# Altium PCB PD1_5.PcbDoc
Units mil, origin at the board's own origin, x right, y up, seen from the top; angles counter-clockwise.
Board outline 4000 x 4000 mil, 2 copper layers (Top Layer, Bottom Layer); 48 components, 29 nets, 246 pads, 55 vias.
Unrouted connection lines stored in the file: 4.
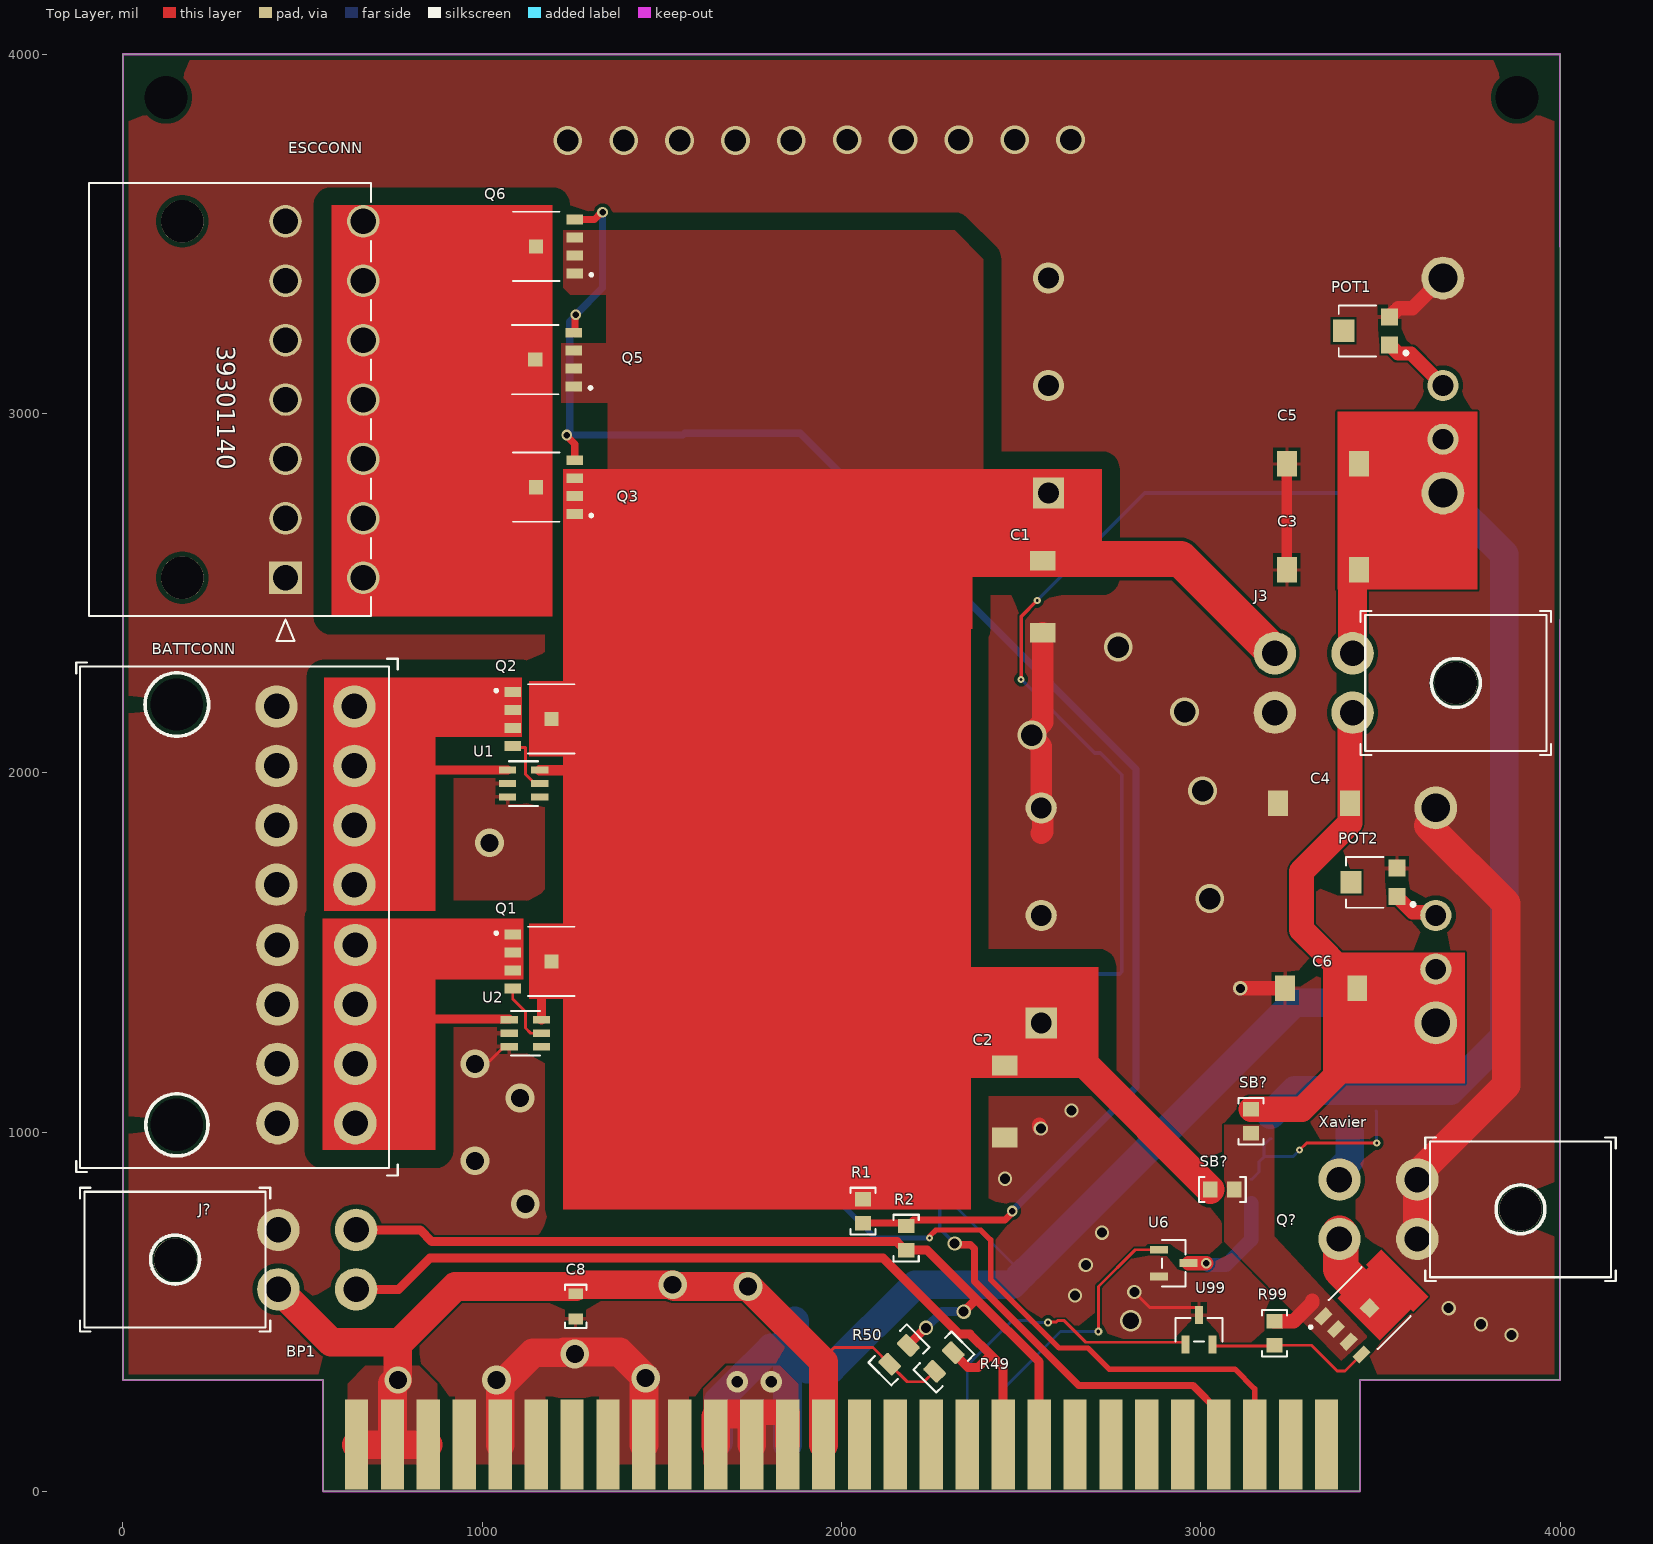
[diagram p0: Top Layer view]
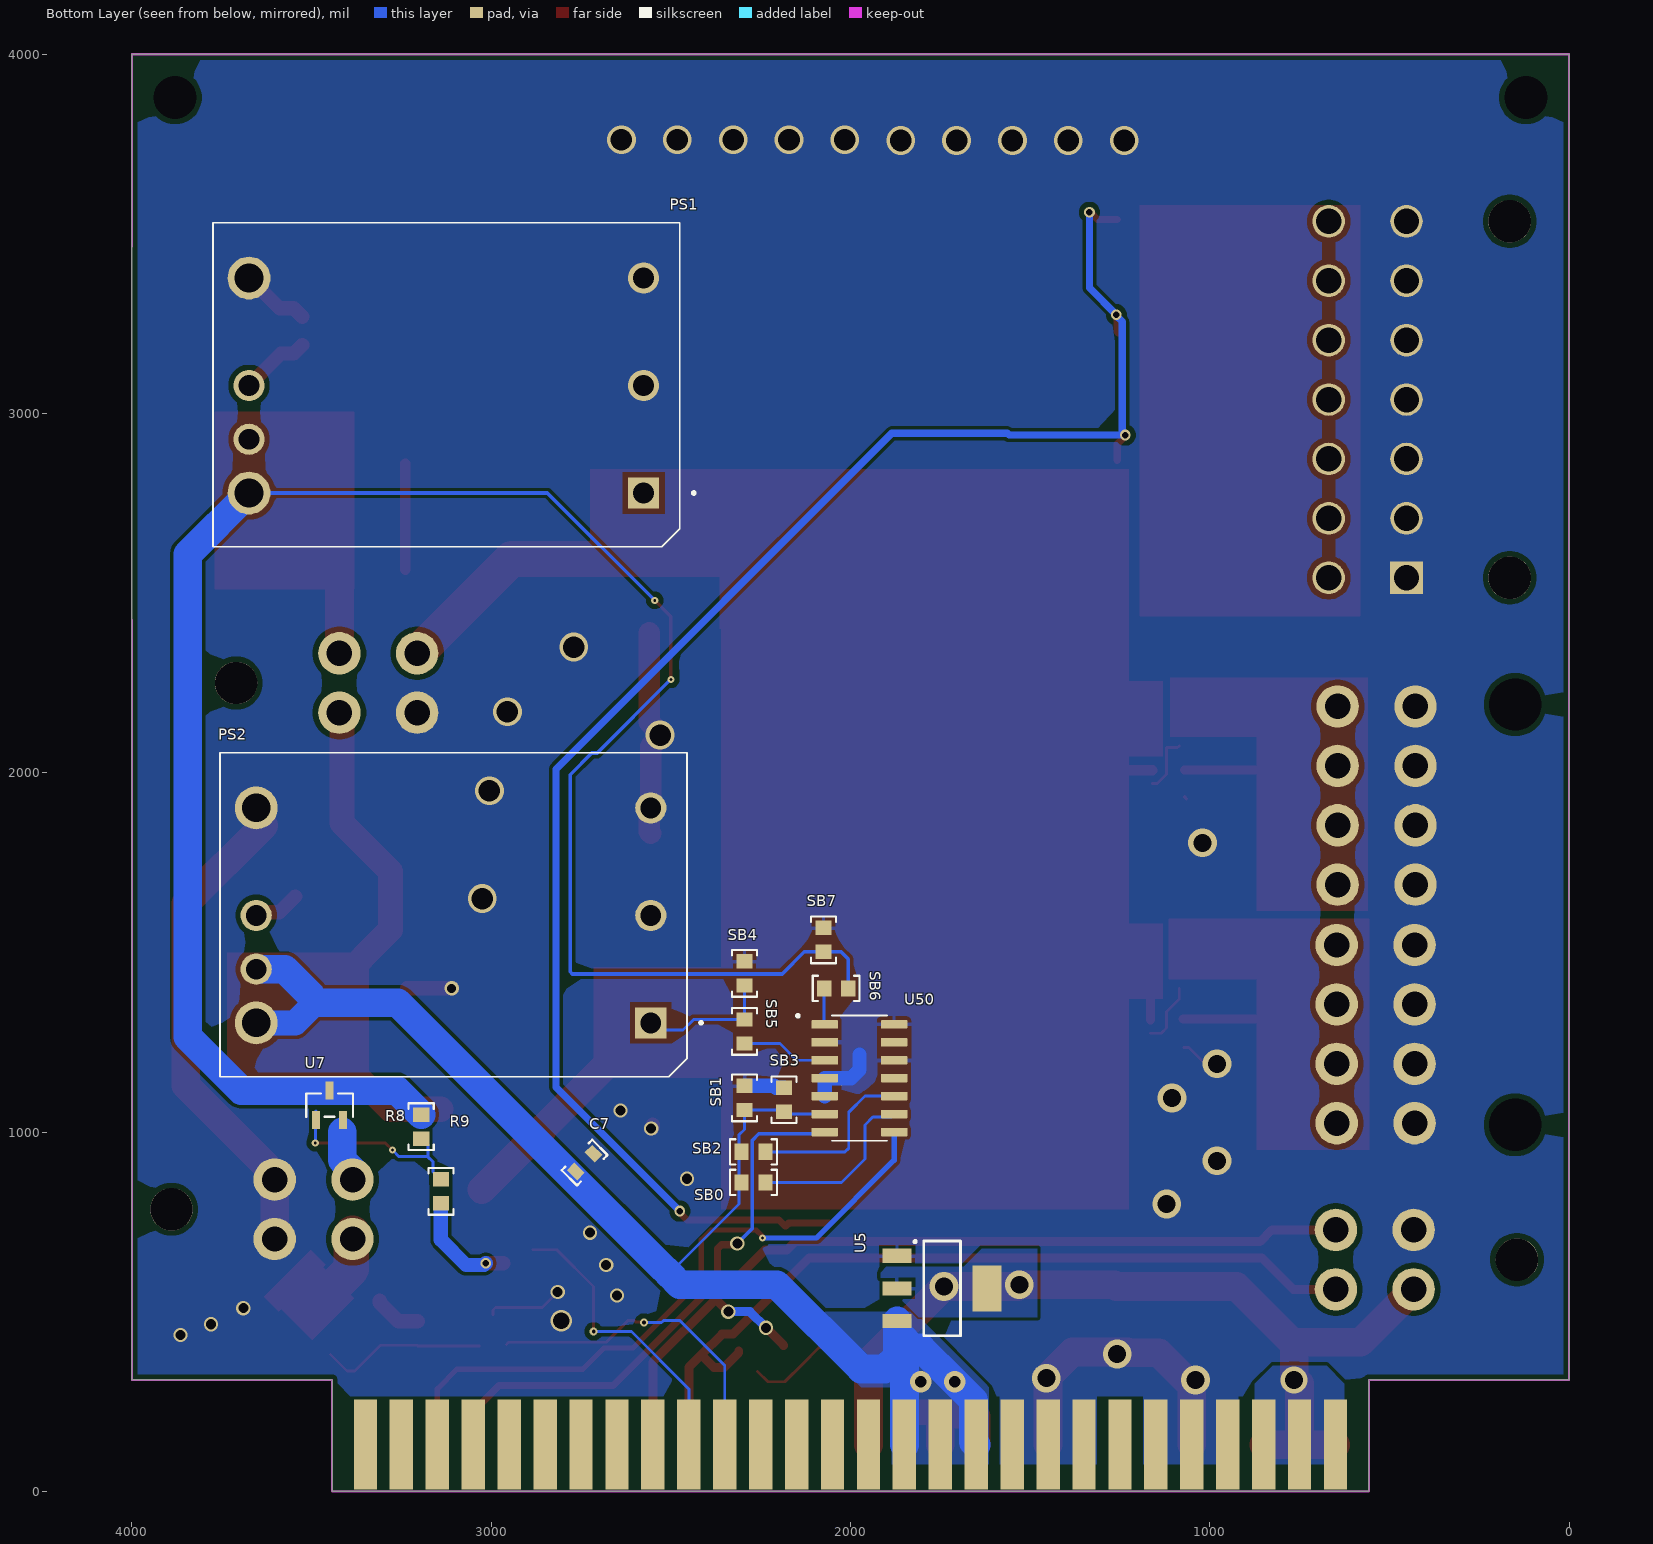
[diagram p1: Bottom Layer view, seen from below]
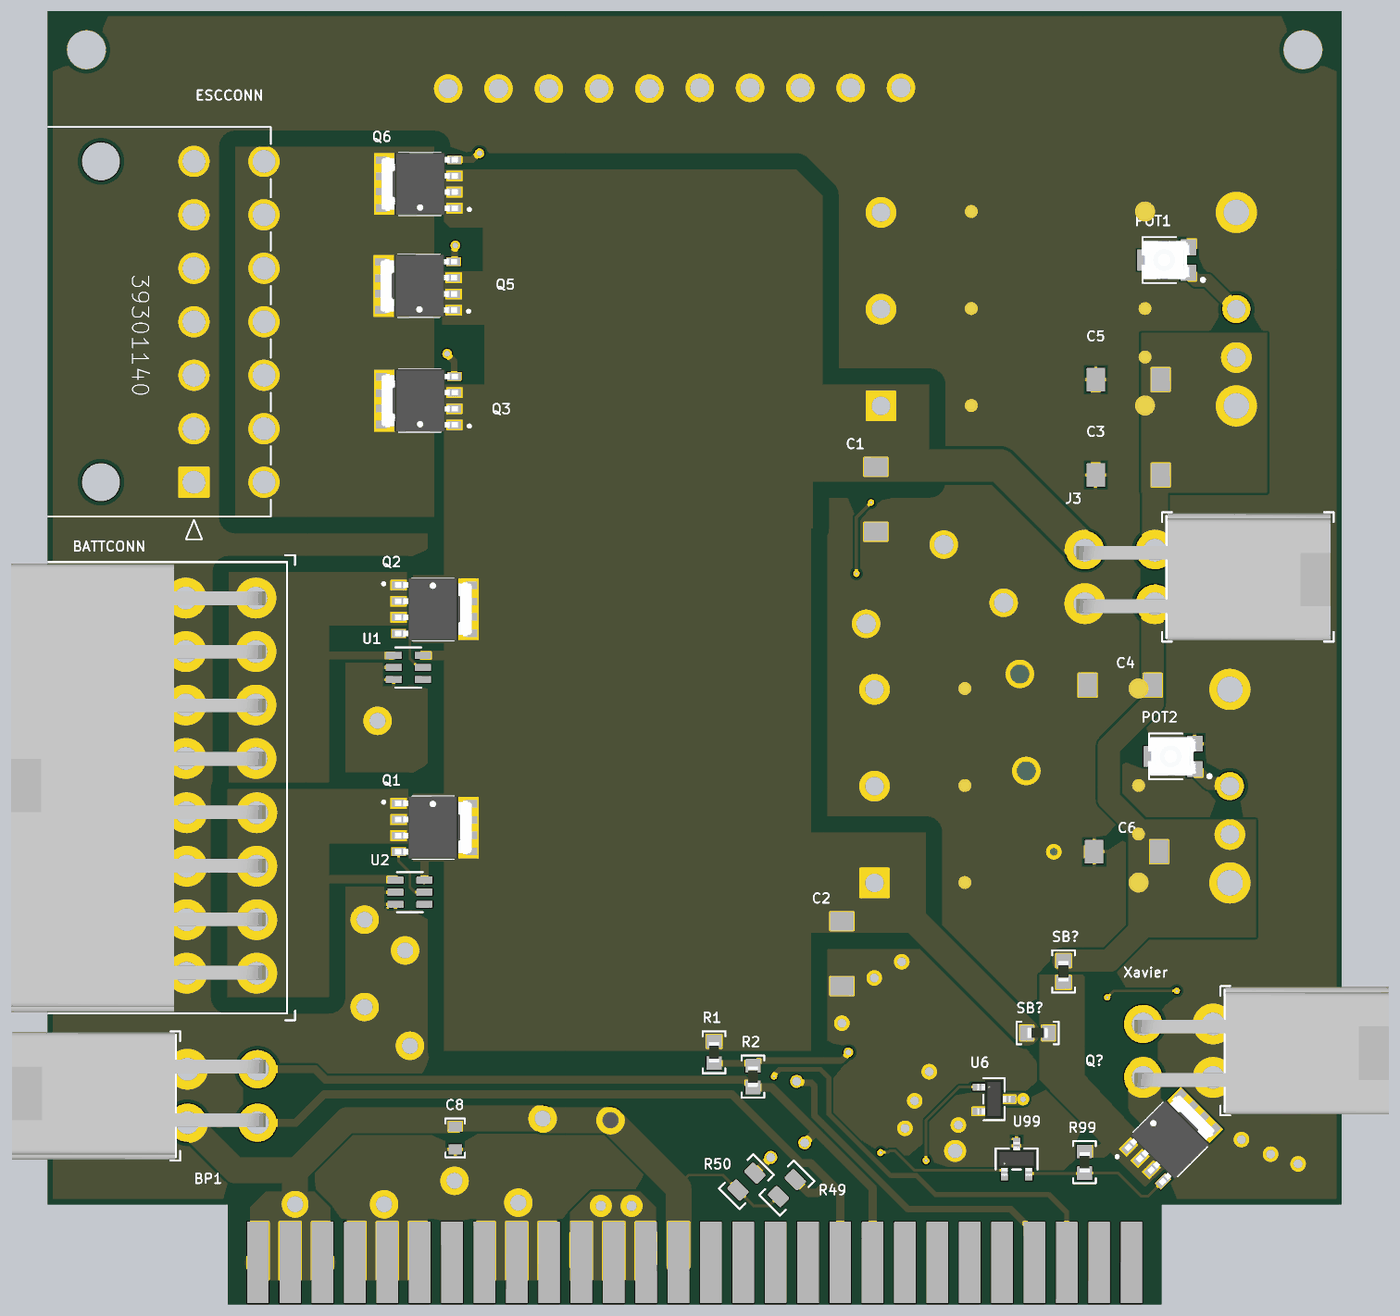
[diagram p2: 3D render of the assembled board from above, using the file's embedded part models]
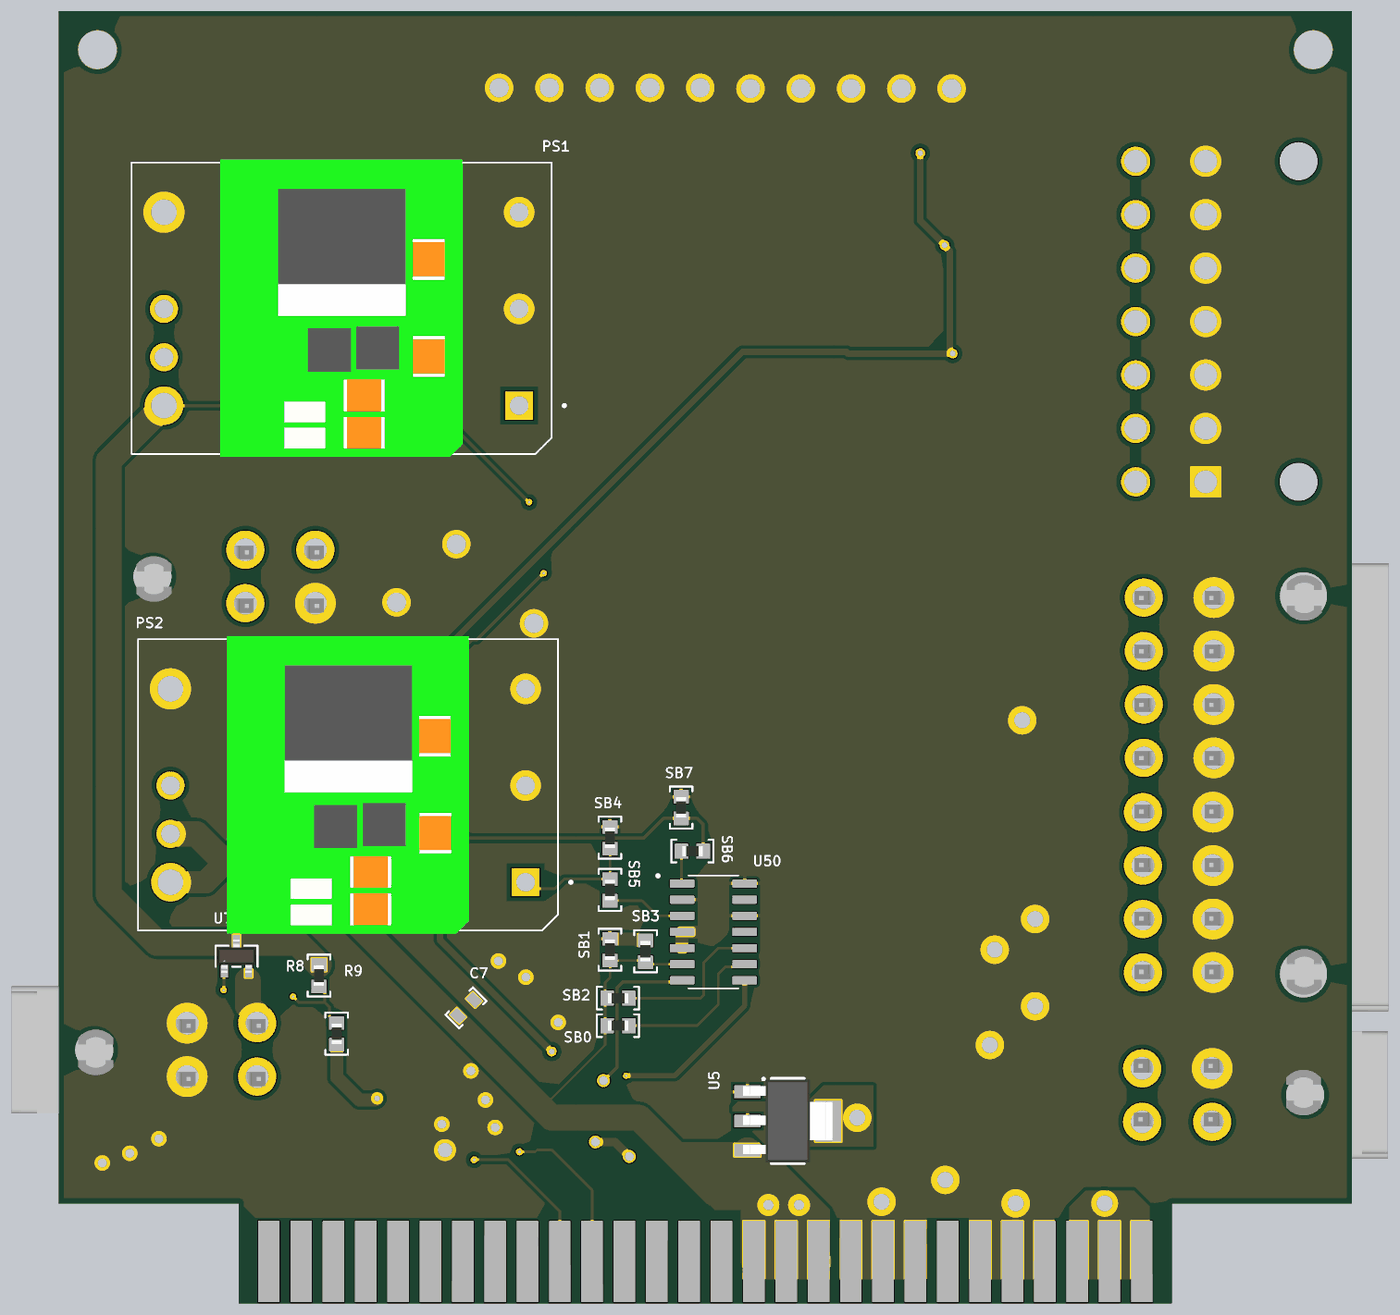
[diagram p3: 3D render of the assembled board from below, using the file's embedded part models]

## Layer stack, top to bottom
Top Solder: solder mask 0.4, Solder Resist, Dk 3.5
Top Layer: signal copper 1.4
Dielectric 1: dielectric 12.6, FR-4, Dk 4.8
Bottom Layer: signal copper 1.4
Bottom Solder: solder mask 0.4, Solder Resist, Dk 3.5

## Board outline
557,0 557,310 0,310 0,4000 4000,4000 4000,3465 4000,2425 4000,310 3443,310 3443,0

## Design rules (kind name [scope] priority, off if disabled: settings)
AcuteAngle [All] p1: minimum=8.75000000000000E+0001 checktracksonly=FALSE
BoardOutlineClearance [All] p1: gap=16 ignorepadtopadclearanceinfootprint=FALSE
Clearance Clearance_5 [InNamedPolygon('GND_L02_P046')] p1: gap=10 ignorepadtopadclearanceinfootprint=FALSE except(0: Arc-Hole Track-Hole SMDPad-Hole THPad-Hole Via-Hole Fill-Hole Poly-Hole Region-Hole Text-Hole; 15: THPad-Poly Via-Poly)
Clearance Clearance_4 [InNamedPolygon('GND_L01_P045') vs InNet('Motor_Power')] p2: gap=10 ignorepadtopadclearanceinfootprint=FALSE except(0: Arc-Hole Track-Hole SMDPad-Hole THPad-Hole Via-Hole Fill-Hole Poly-Hole Region-Hole Text-Hole; 50: Fill-Fill Fill-Poly Poly-Poly)
Clearance Clearance_3 [InNamedPolygon('GND_L01_P045') vs InNet('STBD_BATT')] p3: gap=10 ignorepadtopadclearanceinfootprint=FALSE except(0: Arc-Hole Track-Hole SMDPad-Hole THPad-Hole Via-Hole Fill-Hole Poly-Hole Region-Hole Text-Hole; 50: Fill-Fill Fill-Poly Poly-Poly)
Clearance Clearance_2 [InNamedPolygon('GND_L01_P045') vs InNet('PORT_BATT')] p4: gap=10 ignorepadtopadclearanceinfootprint=FALSE except(0: Arc-Hole Track-Hole SMDPad-Hole THPad-Hole Via-Hole Fill-Hole Poly-Hole Region-Hole Text-Hole; 50: Fill-Fill Fill-Poly Poly-Poly)
Clearance Clearance_1 [InNamedPolygon('GND_L01_P045') vs InNet('V+')] p5: gap=10 ignorepadtopadclearanceinfootprint=FALSE except(0: Arc-Hole Track-Hole SMDPad-Hole THPad-Hole Via-Hole Fill-Hole Poly-Hole Region-Hole Text-Hole; 50: Fill-Poly Poly-Poly)
Clearance [InNamedPolygon('GND_L01_P044')] p6: gap=10 ignorepadtopadclearanceinfootprint=FALSE except(0: Arc-Hole Track-Hole SMDPad-Hole THPad-Hole Via-Hole Fill-Hole Poly-Hole Region-Hole Text-Hole; 50: Fill-Fill Fill-Poly Poly-Poly)
Clearance "Clearance JLCPCB" [All] p7: gap=6 ignorepadtopadclearanceinfootprint=FALSE except(3.5: Arc-Arc Arc-Track Track-Track; 5: Arc-SMDPad Track-SMDPad SMDPad-SMDPad; 10: Arc-Via Arc-Hole Track-Via Track-Hole Via-Via Via-Fill Via-Poly Via-Region Fill-Hole Poly-Hole Region-Hole; 12.99: Arc-THPad Track-THPad; 13: THPad-Fill THPad-Poly THPad-Region; 20: THPad-THPad)
Clearance "Clearance Vplus" [InNet('GND') vs InNet('V+')] p8: gap=6 ignorepadtopadclearanceinfootprint=FALSE except(3.5: Arc-Arc Arc-Track Track-Track; 5: Arc-SMDPad Track-SMDPad SMDPad-SMDPad; 10: Arc-Via Arc-Hole Track-Via Track-Hole Via-Via Via-Fill Via-Poly Via-Region Fill-Hole Poly-Hole Region-Hole; 12.99: Arc-THPad Track-THPad; 13: THPad-Fill THPad-Poly THPad-Region; 20: THPad-THPad; 50: Poly-Poly)
ComponentOrientations [All] p1: allowedrotations=32
DiffPairsRouting "USB 2.0" [InDifferentialPairClass('USB 2.0')] p1: maxlimit=4 minlimit=4 mostfreqgap=4 toplayer_minwidth=9 toplayer_maxwidth=9 toplayer_prefwidth=9 bottomlayer_minwidth=9 bottomlayer_maxwidth=9 bottomlayer_prefwidth=9 impedanceprofiledriven=TRUE impedanceprofileid={B279FAB8-9179-4BDF-8125-EF1A8961339F} maxuncoupledlength=500
DiffPairsRouting [All] p2: maxlimit=10 minlimit=10 mostfreqgap=10 toplayer_minwidth=15 toplayer_maxwidth=15 toplayer_prefwidth=15 bottomlayer_minwidth=15 bottomlayer_maxwidth=15 bottomlayer_prefwidth=15 maxuncoupledlength=500
FanoutControl Fanout_Default [All] p5: bgadir=Out bgaviamode=Centered fanoutstyle=Auto fanoutdirection=OutOnly viagrid=1 // Fanout_Default (Default Rule)
HoleSize "HoleSize JLCPCB" [All] p1: absolutevalues=TRUE maxlimit=245 minlimit=8 maxpercent=80.000 minpercent=20.000
HoleToHoleClearance "HoleToHoleClearance JLCPCB" [All] p1: gap=20 allowstackedmicrovias=TRUE
MinimumAnnularRing "MinimumAnnularRing JLCPCB" [All] p1: minimumring=6
MinimumSolderMaskSliver [All] p1 off: minsoldermaskwidth=10
PasteMaskExpansion [All] p1: expansion=1
PlaneClearance [InNet('GND')] p1: clearance=20
PolygonConnect EdgeConnect [(IsNamedPolygon('PolygonDirect'))] p1: connectstyle=Direct reliefconductorwidth=10 reliefentries=4 polygonreliefangle="90 Angle" airgapwidth=10
PolygonConnect [All] p2: connectstyle=Relief reliefconductorwidth=10 reliefentries=4 polygonreliefangle="90 Angle" airgapwidth=10
RoutingVias "RoutingVias JLCPCB" [All] p1: holewidth=10 width=22 viastyle="Through Hole" minholewidth=8 minwidth=20 maxholewidth=28 maxwidth=40
SMDEntry [All] p1: side=TRUE corner=TRUE anyangle=FALSE
SMDToCorner [All] p1: distance=0
SMDToPlane [All] p1: distance=0
SilkToSilkClearance [All] p1: silktosilkclearance=1
SilkToSolderMaskClearance "SilkToSolderMaskClearance JLCPCB" [IsPad] p1: minsilkscreentomaskgap=6 clearancetoexposedcopper=TRUE
SolderMaskExpansion [All] p1: expansion=4 istentingtop=FALSE
UnRoutedNet [All] p1: checkbadconnections=TRUE
Width "Width JLCPCB 1oz" [All] p1: maxlimit=100 minlimit=5 preferedwidth=8 minimp=50.000000 maximp=50.000000 favimp=50.000000
20 further rules are at their usual default settings.

## Classes and differential pairs
component class "PD1_5 _S2": ? BATTCONN BATTERYCONNECTOR? BP1 ESC_CONN? ESCCONN J3 J? R49 R50 SB0 SB1 SB2 SB3 SB4 SB5 SB6 SB7 U50 Xavier
component class PD1_5: ? BATTERYCONNECTOR? C1 C2 C3 C4 C5 C6 C7 C8 ESC_CONN? POT1 POT2 PS1 PS2 Q1 Q2 Q3 Q5 Q6 Q? R1 R2 R8 R9 R99 SB? U1 U2 U5 U6 U7 U99

## Components (designator, comment, footprint, x,y, rotation, side; value= is the part's Value field where it differs from the comment)
BATTCONN "BatteryConnector" "CONN_MOLEX_MINIFIT JR_16 POS_R/A - duplicate" 150,1850 r270 top
BP1 "Backplane Connector" BACKPLANE_EDGE_CONN 650,130 r0 top
C1 "100uF" CAPAE430X550N 2560,2490 r270 top
C2 "100uF" CAPAE430X550N 2455,1085 r270 top
C3 ".1uF 50V" CAPAE430X550N 3340,2565 r180 top
C4 ".1uF 50V" CAPAE430X550N 3315,1915 r180 top
C5 "22uF 50V" CAPAE430X550N 3340,2860 r180 top
C6 "22uF 50V" CAPAE430X550N 3335,1400 r180 top
C7 "10uF Ceramic 6.3V" CAPACITOR_0603 2740,915 r135 bottom
C8 "47uF Ceramic 6.3V" CAPACITOR_0603 1260,515 r270 top value=47uF
ESCCONN "39301140" CON_39301140 452.4,2542.88 r270 top
J3 "4 POS R/A" "CONN_MOLEX_MINIFIT JR_4 POS_R/A" 3710,2250 r90 top
J? "4 POS R/A" "CONN_MOLEX_MINIFIT JR_4 POS_R/A" 145,645 r270 top
POT1 "TC33X-2-203E" TRIM_TC33X-2-203E 3455,3230 r180 top
POT2 "TC33X-2-203E" TRIM_TC33X-2-203E 3475,1695 r180 top
PS1 "I6A4W020A033V-001-R" CONV_I6A4W020A033V-001-R 3125,3080 r0 bottom
PS2 "I6A4W020A033V-001-R" CONV_I6A4W020A033V-001-R 3105,1605 r0 bottom
Q1 "MOSFET P-CH 30V 45A LFPAK56" TRANS_PSMN5R5-60YS,115 1192.28,1475 r0 top
Q2 "MOSFET P-CH 30V 45A LFPAK56" TRANS_PSMN5R5-60YS,115 1192.28,2150 r0 top
Q3 "MOSFET P-CH 30V 45A LFPAK56" TRANS_PSMN5R5-60YS,115 1150,2795 r180 top
Q5 "MOSFET P-CH 30V 45A LFPAK56" TRANS_PSMN5R5-60YS,115 1147.72,3150 r180 top
Q6 "MOSFET P-CH 30V 45A LFPAK56" TRANS_PSMN5R5-60YS,115 1150,3465 r180 top
Q? "MOSFET P-CH 30V 45A LFPAK56" TRANS_PSMN5R5-60YS,115 3470,510 r45 top
R1 "10k Ohm 5% 1/10W" RESISTOR_0603 2060,780 r270 top
R2 "10k Ohm 5% 1/10W" RESISTOR_0603 2180,705 r270 top
R8 "10k Ohm 5% 1/10W" RESISTOR_0603 3195,1015 r270 bottom
R9 "10k Ohm 5% 1/10W" RESISTOR_0603 3140,835 r270 bottom
R49 "4.7k Ohm 5% 1/8W" RESISTOR_0805 2285,360 r45 top
R50 "4.7k Ohm 5% 1/8W" RESISTOR_0805 2160,380 r45 top
R99 "10k Ohm 5% 1/10W" RESISTOR_0603 3205,440 r270 top
SB0 "0 Ohm Jumper No Fit" RESISTOR_0603 2270,860 r0 bottom
SB1 "0 Ohm Jumper No Fit" RESISTOR_0603 2295,1095 r90 bottom
SB2 "0 Ohm Jumper No Fit" RESISTOR_0603 2270,945 r0 bottom
SB3 "0 Ohm Jumper No Fit" RESISTOR_0603 2185,1090 r90 bottom
SB4 "0 Ohm Jumper No Fit" RESISTOR_0603 2295,1441.5 r90 bottom
SB5 "0 Ohm Jumper No Fit" RESISTOR_0603 2295,1280 r90 bottom
SB6 "0 Ohm Jumper No Fit" RESISTOR_0603 2040,1400 r180 bottom
SB7 "0 Ohm Jumper No Fit" RESISTOR_0603 2075,1535 r90 bottom
SB? "0 Ohm Jumper No Fit" RESISTOR_0603 3060,840 r0 top
SB? "0 Ohm Jumper No Fit" RESISTOR_0603 3140,1030 r270 top
U1 "LTC4412ES6TRPBF" TSOT-23_S6 1115,1970 r0 top
U2 "LTC4412ES6TRPBF" TSOT-23_S6 1120,1275 r0 top
U5 "LM1117IMPX-3.3/NOPB" SOT-223-4 1745,565 r180 bottom
U6 "PMV13XNEAR" SOT-23-3 2925,635 r270 top
U7 "MOSFET P-CHANNEL 20V 4.7A SOT23" SOT-23-3 3450,1075 r180 bottom
U50 "MCP3428-E/SL" SOIC127P600X175-14N 1975,1150 r180 bottom
U99 "PMV13XNEAR" SOT-23-3 2995,450 r0 top
Xavier "4 POS R/A" "CONN_MOLEX_MINIFIT JR_4 POS_R/A" 3890,785 r90 top

## Footprints (in the part's own frame and the unit in brackets; to place one, negate y for a bottom-side part, rotate by r counter-clockwise, add the part's x,y. Pads: shape width x height; smd on the part's side, far side on the other; paste and mask are expansions set on the pad)
BACKPLANE_EDGE_CONN [mil]
  rect 65x250 smd far side: 1(0,0) 2(100,0) 3(200,0) 4(300,0) 5(400,0) 6(500,0) 7(600,0) 8(700,0) 9(800,0) 10(900,0) 11(1000,0) 12(1100,0) 13(1200,0) 14(1300,0) 15(1400,0) 16(1500,0) 17(1600,0) 18(1700,0) 19(1800,0) 20(1900,0) 21(2000,0) 22(2100,0) 23(2200,0) 24(2300,0) 25(2400,0) 26(2500,0) 27(2600,0) 28(2700,0)
  rect 65x250 smd: 29(2700,0) 30(2600,0) 31(2500,0) 32(2400,0) 33(2300,0) 34(2200,0) 35(2100,0) 36(2000,0) 37(1900,0) 38(1800,0) 39(1700,0) 40(1600,0) 41(1500,0) 42(1400,0) 43(1300,0) 44(1200,0) 45(1100,0) 46(1000,0) 47(900,0) 48(800,0) 49(700,0) 50(600,0) 51(500,0) 52(400,0) 53(300,0) 54(200,0) 55(100,0) 56(0,0)
CAPACITOR_0603 [mil] "CAPACITOR 0603"
  rect 30x40 smd: 1(-35,0) 2(35,0)
  silkscreen extent -60,-30 60,30, body extent -31,-16 31,16, height 31
CAPAE430X550N [mm]
  rect 1.4x1.8 smd: 1(-2.55,0) 2(2.55,0)
CON_39301140 [mm]
  rect 2.3x2.3 hole 1.8 mask+0.076: 1(0,0)
  round 2.3 hole 1.8 mask+0.076: 2(-4.2,0) 3(-8.4,0) 4(-12.6,0) 5(-16.8,0) 6(-21,0) 7(-25.2,0) 8(0,5.5) 9(-4.2,5.5) 10(-8.4,5.5) 11(-12.6,5.5) 12(-16.8,5.5) 13(-21,5.5) 14(-25.2,5.5)
  round 3 hole 3 unplated mask+0.076: M1(0,-7.3) M2(-25.2,-7.3)
  silkscreen extent -27.9,-13.9 4.48,6.03, body extent 0,0 0.25,0.25, height 0.25
"CONN_MOLEX_MINIFIT JR_4 POS_R/A" [mm] "Molex Minifit Jr 5569 4 Pos R/A"
  round 3 hole 1.8: 1(2.1,7.3) 2(-2.1,7.3) 3(2.1,12.8) 4(-2.1,12.8)
  round 3 hole 3 unplated mask+0: ""(0,0)
  silkscreen extent -5.08,-6.73 5.08,6.73, body extent -5,-6.48 5,13.46, height 11.4
"CONN_MOLEX_MINIFIT JR_16 POS_R/A - duplicate" [mm] "Molex Minifit Jr 16 Pos R/A"
  round 3 hole 1.801: 1(20.964,7.112) 2(16.764,7.112) 5(4.1,7.046) 6(-0.1,7.046) 9(20.964,12.612) 10(16.764,12.612) 13(4.1,12.546) 14(-0.1,12.546)
  round 3 hole 1.8: 3(12.564,7.112) 4(8.364,7.112) 7(-4.3,7.046) 8(-8.5,7.046) 11(12.564,12.612) 12(8.364,12.612) 15(-4.3,12.546) 16(-8.5,12.546)
  round 3 hole 3.7 unplated mask+0: ""(-8.636,0) ""(21.082,0)
  silkscreen extent -11.87,-7.11 24.66,15.62, body extent -11.18,-6.67 24.02,13.27, height 11.4
CONV_I6A4W020A033V-001-R [mm]
  rect 2.205x2.205 hole 1.47: 1(-13.95,7.65)
  round 2.205 hole 1.47: 2(-13.95,0.05) 3(-13.95,-7.55) 6(13.95,0.05) 7(13.95,3.85)
  round 3.03 hole 2.02: 4(13.95,-7.55) 8(13.95,7.65)
  silkscreen extent -17.6,-11.45 16.5,11.45, body extent -9.53,-11.68 9.53,11.68, height 9.65
RESISTOR_0603 [mil] "Resistor 0603"
  rect 40x45 smd: 1(-33.5,0) 2(33.5,0)
  silkscreen extent -65,-35 65,35, body extent -31,-16 32,16, height 16
RESISTOR_0805 [mm]
  rrect25% 1x1.42 smd: 1(-0.935,0) 2(0.935,0)
  silkscreen extent -1.9,-1.14 1.9,1.14
SOIC127P600X175-14N [mm]
  rrect25% 1.9x0.6 smd: 1(-2.455,3.81) 2(-2.455,2.54) 3(-2.455,1.27) 4(-2.455,0) 5(-2.455,-1.27) 6(-2.455,-2.54) 7(-2.455,-3.81) 8(2.455,-3.81) 9(2.455,-2.54) 10(2.455,-1.27) 11(2.455,0) 12(2.455,1.27) 13(2.455,2.54) 14(2.455,3.81)
  silkscreen extent -4.45,-4.43 1.95,4.51
SOT-23-3 [mil]
  rect 22x50 smd paste+0 mask+4: 1(-37.5,-41) 2(37.5,-41) 3(0,41)
  silkscreen extent -65,-33 65,33, body extent -60,-52 60,52, height 44
SOT-223-4 [mm]
  rect 2.05x1 smd paste+0 mask+0.102: 1(-3.175,2.3) 2(-3.175,0) 3(-3.175,-2.3)
  rect 2.05x3.25 smd paste+0 mask+0.102: 4(3.175,0)
  silkscreen extent -1.96,-3.35 1.3,3.35, body extent -3.5,-3.25 3.5,3.25, height 1.68
TRANS_PSMN5R5-60YS,115 [mm]
  rect 1.15x0.7 smd paste-2 mask+0: 1(-2.725,1.905) 2(-2.725,0.635) 3(-2.725,-0.635) 4(-2.725,-1.905)
  rect 1x1 smd paste-1 mask+0: 5(0,0)
  Top Layer region: 3.5,-2.35 2,-2.35 2,-2.1 -1.1,-2.1 -1.1,2.1 2,2.1 2,2.35 3.5,2.35
  silkscreen extent -4,-2.45 1.65,2.45, body extent -3,-2.45 3,2.45, height 1.2
TRIM_TC33X-2-203E [mm]
  rect 1.2x1.2 smd: 1(-1.8,1) 3(-1.8,-1)
  rect 1.5x1.6 smd: 2(1.45,0)
  silkscreen extent -3.07,-1.8 1.8,1.8, body extent -1.9,-1.5 1.9,1.5, height 1.1
TSOT-23_S6 [mil]
  rect 48x20 smd: 1(-45,37.4) 2(-45,0) 3(-45,-37.4) 4(45,-37.4) 5(45,0) 6(45,37.4)
  silkscreen extent -40,-62 40,62

## Part data
BP1: library part BACKPLANE_EDGE_CONN, "Titan Backplane Edge Connector"
C1 C2 C3 C4 C5 C6: library part 865250340002, "4.7ÂµF 16V Aluminum Electrolytic Capacitors Radial, Can - SMD 2000 Hrs @ 85Â°C", Package=None, Availability=Warning, Check_prices=https://www.snapeda.com/parts/865250340002/W%C3%BCrth%20Elektronik/view-part/5002976/?ref=eda, MF="Wurth Elektronik", MP=865250340002, Price=None, Purchase-URL=https://pricing.snapeda.com/search/part/865250340002/?ref=eda, SnapEDA_Link=https://www.snapeda.com/parts/865250340002/W%C3%BCrth%20Elektronik/view-part/5002976/?ref=snap
C7: library part CAPACITOR_10uF_0603, "Cap 10uF 6.3V +/-20% / Ceramic 0603", Supplier Part Number 1=1276-1119-1-ND, Tolerance="+/- 20%", Value (uF)=10, Voltage=6.3V, ComponentLink1Description=Digikey, ComponentLink1URL=https://www.digikey.com/en/products/detail/samsung-electro-mechanics/CL10A106MQ8NNNC/3886777, Made By="Flip B", Supplier 1=Digi-Key
C8: library part CAPACITOR_47uF_0603, "Cap 47uF 6.3V +/-20% / Ceramic 0603", Supplier Part Number 1=490-13247-1-ND, Tolerance="+/- 20%", Voltage=6.3V, ComponentLink1Description=Datsheet, ComponentLink1URL=https://www.mouser.com/datasheet/2/212/KEM_C1002_X7R_SMD-1102033.pdf, Made By="Flip B", Supplier 1=Digi-Key
ESCCONN: "No Description Available", Mfr_Name="Molex Connector Corporation", Copyright="Copyright (C) 2022 Ultra Librarian. All rights reserved.", Manufacturer_Part_Number=39301140, RefDes=RefDes, Type=DEV
J3 J? Xavier: library part "CONN_MOLEX_MINIFIT JR_4POS_R/A", "Molex Minifit Jr. 5569  / 4 Pos R/A Natural", Color=Natural, Current Per Pin=13A, Manufacturer=Molex, Supplier Part Number 1=WM13112-ND, ComponentLink1Description=Datasheet, ComponentLink1URL=https://www.molex.com/pdm_docs/sd/026013115_sd.pdf, Configuration="Right Angle", Created By="Flip B", Number of Positions=4, Pitch=4.2mm, Series="Minifit Jr 5569", Supplier 1=Digi-Key
POT1 POT2: "20 kOhms 0.1W, 1/10W J Lead Surface Mount Trimmer Potentiometer Cermet 1 Turn Top Adjustment", Package="1608 Bourns", Check_prices=https://www.snapeda.com/parts/TC33X-2-203E/Bourns/view-part/312812/?ref=eda, Digi-Key_Part_Number=TC33X-2-203ECT-ND, MF=Bourns, MP=TC33X-2-203E, Purchase-URL=https://pricing.snapeda.com/search/part/TC33X-2-203E/?ref=eda, SnapEDA_Link=https://www.snapeda.com/parts/TC33X-2-203E/Bourns/view-part/312812/?ref=snap
PS1 PS2: "Non-Isolated PoL Module DC DC Converter 1 Output 3.3 ~ 15V 20A 9V - 53V Input", Package="DIP-8 TDK-Lambda", Availability="In Stock", Check_prices=https://www.snapeda.com/parts/I6A4W020A033V-001-R/TDK-Lambda%20Americas%20Inc./view-part/1737324/?ref=eda, MF="TDK-Lambda Americas", MP=I6A4W020A033V-001-R, Price=None, Purchase-URL=https://pricing.snapeda.com/search/part/I6A4W020A033V-001-R/?ref=eda, SnapEDA_Link=https://www.snapeda.com/parts/I6A4W020A033V-001-R/TDK-Lambda%20Americas%20Inc./view-part/1737324/?ref=snap
Q1 Q2 Q3 Q5 Q6 Q?: library part BUK6Y19-30PX, "P-Channel 30 V 45A (Ta) 66W (Ta) Surface Mount LFPAK56, Power-SO8"
R1 R2 R8 R9 R99: library part RESISTOR_10K_0603, "RES 10k OHM 5% 1/10W 0603", Digikey Part Numer=CR0603-JW-104ELFTR-ND, Supplier Part Number 1=2019-RK73B1JTTD103JCT-ND, Tolerance="+/- 5%", Value  (Ohms)=10K, ComponentLink1Description=Datasheet, ComponentLink1URL=https://www.bourns.com/docs/product-datasheets/CRxxxxx.pdf, Made By="Robert Pafford", Supplier=Digikey, Supplier 1=Digi-Key, Wattage=1/8W
R49 R50: library part RESISTOR_4.7K_0805, "RES 4.7k OHM 5% 1/8W 0805", Digikey Part Numer=CR0603-JW-104ELFTR-ND, Tolerance="+/- 5%", Value  (Ohms)=4.7K, ComponentLink1Description=Datasheet, Made By="Robert Pafford", Supplier=Digikey, Wattage=1/8W
SB0 SB1 SB2 SB3 SB4 SB5 SB6 SB7 SB? SB?: library part JUMPER_0_0603, "0 Ohm Jumper No Fit for Solder Bridge", Value  (Ohms)=0, ComponentLink1Description=Digikey, ComponentLink1URL=https://www.digikey.com/en/products/detail/koa-speer-electronics-inc/RK73B1JTTD101J/9844701, Made By="Robert Pafford"
U1 U2: "OR Controller Source Selector Switch P-Channel 2:1 TSOT-23-6", Package="SOT-23-6 Analog Devices", Arrow_Europe-Purchase-URL=https://snapeda.com/shop?store=Arrow+Europe&id=4343773, Availability=Good, Check_prices=https://www.snapeda.com/parts/LTC4412ES6%23TRPBF/Analog%20Devices/view-part/4343773/?ref=eda, DigiKey-Purchase-URL=https://snapeda.com/shop?store=DigiKey&id=4343773, MF="Analog Devices", Mouser-Purchase-URL=https://snapeda.com/shop?store=Mouser&id=4343773, MP=LTC4412ES6#TRPBF, Price=None, SnapEDA_Link=https://www.snapeda.com/parts/LTC4412ES6%23TRPBF/Analog%20Devices/view-part/4343773/?ref=snap
U5: "IC REG LIN 3.3V 800MA SOT223-4", Manufacturer="Texas Instruments", Package=SOT-223-4, PartNumber=LM1117IMP-3.3/NOPB, Supplier Part Number 1=LM1117IMPX-3.3/NOPBCT-ND, Amp Out=800mA, Created By="Dylan T", Supplier 1=Digi-Key, Vin (Max)=15V, Vout (Min/Fixed)=3.3V
U6 U99: "N-Channel 20 V 7.3A (Ta) 610mW (Ta), 8.3W (Tc) Surface Mount TO-236AB", Amp Rating="7.3 A", Package=SOT23-3L, Power Dissipation="610mW (Ta), 8.3W (Tc)", Supplier Part Number 1=771-PMV13XNEAR, Created By="Dylan T", FET Type=N-Channel, Manufacturer _Part_Number=PMV13XNEAR, Rds (on)="15mOhm @ 7.3A, 8V", SourceLibrary=ON_Semiconductor_2020-01-13, Supplier 1=Mouser, Vdss="20 V", Vendor="Nexperia USA Inc.", Vgs (Max)="+/- 12 V", Vgs (th)="1.3V @ 250uA"
U7: library part TSM500P02CX, "P-Channel 20 V 4.7A (Tc) 1.56W (Tc) Surface Mount SOT-23", Amp Rating="4.7 A", Package="TO-236-3, SC-59, SOT-23-3", Power Dissipation="1.56W (Tc)", Supplier Part Number 1=TSM500P02CXRFGCT-ND, Created By="Robert Pafford", FET Type=P-Channel, Manufacturer_Part_Number=TSM500P02CX, Rds (on)="50mOhm @ 3A, 4.5V", Supplier 1=Digi-Key, Vdss="20 V", Vendor="Taiwan Semiconductor Corporation", Vgs (Max)=±10V, Vgs (th)="800mV @ 250µA"
U50: "16 Bit Analog to Digital Converter 4 Input 1 Sigma-Delta 14-SOIC", Package="SOIC-14 Microchip", Availability=Unavailable, BuyPart=https://www.snapeda.com/parts/MCP3428-E/SL/Microchip/view-part/13249/?ref=eda, MF=Microchip, MP=MCP3428-E/SL, Price=None, SnapEDA_Link=https://www.snapeda.com/parts/MCP3428-E/SL/Microchip/view-part/13249/?ref=snap

## Free pads (board coordinates)
  round 60 hole 120: 1(120,3880) 1(3880,3880)

## Via types
v1: diameter 80, hole 60, Top Layer to Bottom Layer, 15 vias
v2: diameter 40, hole 28, Top Layer to Bottom Layer, 13 vias
v3: diameter 80, hole 50, Top Layer to Bottom Layer, 10 vias
v4: diameter 20, hole 8, Top Layer to Bottom Layer, 5 vias
v5: diameter 30, hole 18, Top Layer to Bottom Layer, 5 vias
v6: diameter 22, hole 10, Top Layer to Bottom Layer, 2 vias
v7: diameter 60, hole 32, Top Layer to Bottom Layer, 2 vias
v8: diameter 60, hole 45, Top Layer to Bottom Layer, 1 vias
v9: diameter 75, hole 50, Top Layer to Bottom Layer, 1 vias
v10: diameter 40, hole 25, Top Layer to Bottom Layer, 1 vias

## Nets (pads, with @x,y where several pads share a name; then routed paths per layer and width w, separated by ;. In a path a pad name is that pad's centre, name@x,y a point inside that pad or via, vN(x,y) a via of type N, cw(c..) or ccw(c..) an arc to the next point about the centre after c; other vN are vias at no path point)
3V3: BP1.1 BP1.2 BP1.3 BP1.43 BP1.54 BP1.55 BP1.56 C8.1 J?.1 R49.1 R50.1 U5.2 U5.4 | length 2843.5
  Top Layer w8: 1950,360 1950,370 1980,400 2087.94,400 R50.1 2182.94,305 2230,305 R49.1
  Top Layer w80: J?.1 579.72,415 748.14,415 765,398.14 v9(765,310) ; BP1.56 BP1.55 ; 759.07,404.07 925,570 1260,570 1265,575 v3(1530,575) 1535,570 v3(1740,570) 1950,360 BP1.43 ; v9@765,315 750,300 BP1.55 ; BP1.54 BP1.55
+5: BP1.11 BP1.12 BP1.13 BP1.44 BP1.45 BP1.46 C4.1 C6.1 C7.1 J3.2 PS2.7 PS2.8 SB0.2 SB1.1 SB2.2 SB3.1 SB?.1@3140,1063.5 U5.3 U50.6 | length 5855.3
  Top Layer w70: BP1.45@1750,207.5 1750,217.5 1752.5,220 1847.5,220 1850,217.5 BP1.44 ; SB?.1@3140,1063.5 3281.89,1063.5 3427.95,1209.57 3427.95,1399.57 3428.39,1400 C6.1 3435.39,1407.87 3280,1563.27 3280,1725 3415.39,1860.39 C4.1 3415.39,2160.12 J3.2
  Top Layer w80: BP1.46 1650,207.5 1657.5,215 1742.5,215 1750,207.5 BP1.45
  Bottom Layer w8: U50.6 2174,1050 2179.19,1044.81 2185.81,1044.81 2202.5,1061.5 SB1.1 2295,1007.5 2310,992.5 2310,970 2310,945 2310,871.5 2311.5,870 2311.5,847.5 2310,846 2310,800 2477.5,632.5 2532.5,632.5
  Bottom Layer w70: 3504.61,1383.43 3504.61,1344.82 3545.61,1303.82 PS2.8
  Bottom Layer w80: BP1.11 1657.5,137.5 1657.5,252.5 v7(1710,305) 1803.75,398.75 1826.25,398.75 1850,422.5 ; BP1.13 1850,375 ; U5.3 1870,422.5 1870,375 1904.36,340.64 1970.64,340.64 2205,575 2475,575 2505,605 2532.5,632.5 2777.5,877.5 3260,1360 3481.18,1360 ; 3504.61,1383.43 3574.61,1453.43 PS2.7
  other v7: 1805,305
+12: C3.1 C5.1 J3.1 PS1.7 PS1.8 R8.1 SB6.2 SB7.1 U7.3 | length 6196.1
  Top Layer w10: v4(2500,2260) 2500,2435 v4(2545,2480)
  Top Layer w80: J3.1 3422.6,2527.2 PS1.8
  Bottom Layer w10: SB6.2 2006.5,1481.5 2026.5,1501.5 SB7.1 2128.5,1501.5 2190,1440 2774.14,1440 2780,1445.86 2780,1995 2720,2055 2705,2055 v4(2500,2260) ; v4(2545,2480) 2843.82,2778.82 PS1.8
  Bottom Layer w80: R8.1 3262.5,1116 3695.69,1116 3845,1265.31 3845,2608.03 PS1.8
AUX_SWITCH: BP1.38 J?.3 R49.2 | length 2319.2
  Top Layer w25: J?.3 767.32,562.32 855,650 2115,650 2327.5,437.5 2357.5,437.5 2415,380 ; R49.2@2311.03,391.03 R49.2 2352.06,345 2380,345 2415,380 ; BP1.38 2450,345 2415,380
GND: BATTCONN.1 BATTCONN.2 BATTCONN.3 BATTCONN.4 BATTCONN.5 BATTCONN.6 BATTCONN.7 BATTCONN.8 BP1.4 BP1.5 BP1.6 BP1.8 BP1.9 BP1.10 BP1.47 BP1.48 BP1.49 BP1.51 BP1.52 BP1.53 C1.2 C2.2 C3.2 C4.2 C5.2 C6.2 C7.2 C8.2 ESCCONN.1 ESCCONN.2 ESCCONN.3 ESCCONN.4 ESCCONN.5 ESCCONN.6 ESCCONN.7 J3.4 J?.2 POT1.3 POT2.3 PS1.2 PS1.3 PS1.4 PS2.2 PS2.3 PS2.4 SB1.2 SB3.2 SB4.2 SB7.2 U1.2 U1.3 U2.2 U2.3 U5.1 U6.2 U50.2 U50.4 U50.5 U50.12 U50.14 U99.3 Xavier.1 Xavier.2 | length 3981
  Top Layer w8: v3@1010,1195 1012.68,1197.68 1021.08,1197.68 1058.4,1235 U2.3@1072.4,1235 ; v2(2815,555) 2858,512 2988,512 2995,505 U99.3
  Top Layer w10: U1.3@1065,1927.6 U1.3
  Top Layer w30: C3.2 C5.2
  Top Layer w40: v2@2550,1020 2550,1015 v2(2555,1010) ; v10(3110,1400) C6.2 ; POT1.3 3549.49,3292.99 3589.26,3292.99 3673.51,3377.24 PS1.4
  Top Layer w60: 2555.79,1832.24 2560,1836.46 2560,1882.24 2555.79,1886.46 2555.79,2073.8 2530,2099.59 2530,2110.41 2560,2140.41 C1.2
  Top Layer w80: BP1.52 1050,294.47 1094.44,338.91 1141.45,385.92 1226.1,385.92 1227.77,387.59 1382.41,387.59 v3(1455,315) ; BP1.48 v3@1450,315 ; J3.4 J3.4@3213.35,2160.03 ; Xavier.2@3602.6,717.32 3602.6,882.68 3850,1130.08 3850,1636.46 PS2.4@3633.23,1853.23
  Bottom Layer w40: 1975,1215 1975,1173.43 1998.43,1150 U50.4 U50.5 ; SB3.2 2207.5,1123.5 2212.5,1128.5 SB1.2
  other v1: 3025,1650 3005,1950 2530,2105 2955,2170 2770,2350 1238.27,3760 1393.75,3760 1549.23,3760 1704.71,3760 1860.19,3760 2015.67,3762.31 2171.15,3762.31 2326.63,3762.31 2482.11,3762.31 2637.59,3762.31
  other v2: 3865,435 3780,465 3690,510 2650,545 2680,630 2725,720 2455,870 2640,1060
  other v3: 1040,310 1257.77,382.59 1120,800 980,920 1105,1095 980,1190 1020,1805
  other v8: 2805,475
Killswitch: BP1.37 J?.4 R2.2 R50.2 | length 2525.8
  Top Layer w25: J?.4 827.32,727.68 860,695 2154,695 2177.5,671.5 2238.5,671.5 2375,535 ; R50.2 v2(2235,455) ; v2(2340,500) 2375,535 ; BP1.37 2550,360 2375,535
  Bottom Layer w25: v2(2235,455) 2280,500 v2(2340,500)
Motor_Power: ESCCONN.8 ESCCONN.9 ESCCONN.10 ESCCONN.11 ESCCONN.12 ESCCONN.13 ESCCONN.14 Q3.5 Q5.5 Q6.5
NetBP1_29: BP1.29 BP1.31 U50.8 | length 1855.1
  Top Layer w15: v4(2245,705) 2245,710 2262.5,727.5 2387.5,727.5 2415,700 2415,589.39 2605.37,399.02 2685.98,399.02 2745,340 3095,340 3150,285 BP1.31
  Bottom Layer w15: U50.8 1878.35,921.65 2095,705 v4(2245,705)
NetBP1_30: BP1.30 BP1.32 U50.7 | length 1589.1
  Top Layer w20: v2(2315,690) 2318.83,686.17 2358.83,686.17 2370,675 2370,585 2660,295 2977.5,295 3050,222.5 BP1.32
  Bottom Layer w10: U50.7 2076.65,995 2255,995 2273.5,976.5 2273.5,731.5 v2(2315,690)
NetPOT1_1: POT1.1 PS1.6 | length 195
  Top Layer w40: POT1.1 3549.49,3167.01 3585.24,3167.01 PS1.6
NetPOT2_1: POT2.1 PS2.6 | length 151.4
  Top Layer w40: POT2.1 3589.51,1611.99 3645.26,1611.99 PS2.6 ; PS2.6@3632.59,1607.98 3645.26,1595.31 PS2.6@3645.26,1591.99
NetQ1_4: Q1.4 U2.5 | length 175.7
  Top Layer w8: Q1.4 1085,1370 1120,1335 1120,1290 1135,1275 U2.5
NetQ2_4: Q2.4 U1.5 | length 161.8
  Top Layer w8: Q2.4 1090,2070 1120,2070 1120,1996 1146,1970 U1.5
NetQ3_4: Q3.4 Q5.4 Q6.4 R1.2 R2.1 | length 4658.4
  Top Layer w20: v5(1235,2940.03) 1235,2937.32 1257.28,2915.04 Q3.4 ; Q5.4 1258.09,3228.09 1258.09,3273.09 v5(1260,3275) ; Q6.4 1312.29,3540 1332.29,3560 v5(1335,3560) ; R1.2 2172,746.5 R2.1 2182.5,738.5 2199,755 2455,755 2473.09,773.09 2473.09,778.09 v5(2475,780)
  Bottom Layer w20: v5(1235,2940.03) v5@1239.97,2945 ; v5@1238.27,2943.29 1238.27,2941.38 1239.62,2940.03 1558.87,2940.03 1563.84,2945 1885,2945 2820,2010 2820,1125 v5(2475,780) ; v5@1243.69,2948.71 1243.69,3255.98 1260,3272.29 v5(1260,3275) 1335,3350 v5(1335,3560)
NetQ?_1: Q?.1 Q?.2 Q?.3 R99.1 SB?.2 | length 131.3
  Top Layer w40: R99.1 3258.5,473.5 3310,525 3310,530
NetQ?_4: Q?.4 R99.2 U99.2 | length 463.4
  Top Layer w8: U99.2@3032.5,405 R99.2@3205,405 ; R99.2 3308.5,406.5 3380,335 3401.07,335 Q?.4
NetR8_2: R8.2 R9.1 U7.1 | length 558.2
  Top Layer w8: v4(3275,950) 3295,970 v4(3490,970)
  Bottom Layer w8: R9.1 3142.5,868.5 3162.5,888.5 3162.5,917.5 3176.5,931.5 ; R8.2 3192.5,981.5 3176.5,965.5 3176.5,931.5 ; v4(3275,950) 3256.5,931.5 3176.5,931.5 ; 3487.5,1059 3488.75,1057.75 3488.75,971.25 v4(3490,970)
NetR9_2: R9.2 U6.3 | length 306.6
  Top Layer w40: U6.3 v5(3015,635)
  Bottom Layer w40: v5(3015,635) 3020,630 3070,630 3140,700 R9.2
NetSB0_1: SB0.1 U50.9 | length 492.5
  Bottom Layer w8: U50.9 1886.16,1042.19 1937.81,1042.19 1960,1020 1960,925 2025,860 SB0.1
NetSB2_1: SB2.1 U50.10 | length 480.9
  Bottom Layer w8: U50.10 1960,1100 2005,1055 2005,955 2015,945 SB2.1
NetSB5_1: SB5.1 U50.3 | length 242.6
  Bottom Layer w8: U50.3 2150,1200 2196.5,1246.5 SB5.1
NetSB6_1: SB6.1 U50.1 | length 100.8
  Bottom Layer w8: U50.1 2073.5,1301.85 SB6.1
PLTA_OnOff: BP1.18 U99.1 | length 910.9
  Top Layer w8: v6(2574.85,469.85) 2576,471 2597.85,471 2601.85,475 2620,475 2680,415 2951.5,415 U99.1
  Bottom Layer w8: BP1.18 2350,350 2475,475 2520.45,475 2525.61,469.85 v6(2574.85,469.85)
PLTACONN: Q?.5 Xavier.4 | length 214.3
  Top Layer w100: Xavier.4@3386.06,717.32 3389.53,713.86 3389.53,618.31 Q?.5@3470,537.84
PORT_BATT: BATTCONN.13 BATTCONN.14 BATTCONN.15 BATTCONN.16 Q2.1 Q2.2 Q2.3 U1.1 | length 367.7
  Top Layer w8: 815,1860 815,1964 831,1980 ; 830,2010 832.6,2007.4
  Top Layer w25: 832.6,2007.4 U1.1
STBD_BATT: BATTCONN.9 BATTCONN.10 BATTCONN.11 BATTCONN.12 Q1.1 Q1.2 Q1.3 U2.1 | length 436.5
  Top Layer w25: 661.54,1259.29 717.24,1315 U2.1@1075,1315
V+: C1.1 C2.1 J3.3 PS1.1 PS2.1 Q1.5 Q2.5 Q3.1 Q3.2 Q3.3 Q5.1 Q5.2 Q5.3 Q6.1 Q6.2 Q6.3 R1.1 SB4.1 SB5.2 SB?.1@3026.5,840 U1.6 U2.6 | length 2376.7
  Top Layer w25: U2.6 1165,1415 1187.44,1437.44 1187.44,1470.16 Q1.5
  Top Layer w30: U1.6 1257.6,2007.4 1260,2005 1260,2150 Q2.5
  Top Layer w80: PS2.1@2555,1285.39 2555,1284.61 2555.79,1283.82 2559.19,1280.41 2628.14,1280.41 2675,1233.55 2675,1191.5 SB?.1@3026.5,840
  Top Layer w100: 2495,2645 2545,2595 2943.74,2595 J3.3
  Bottom Layer w8: SB4.1 SB5.2 2436.5,1313.5 2466.18,1283.82 PS2.1@2555.79,1283.82
Xavier_OnOff: BP1.19 U6.1 | length 822.7
  Top Layer w8: v6(2715,445) 2715,570 2817.5,672.5 U6.1
  Bottom Layer w8: BP1.19 2450,285 2610,445 v6(2715,445)
XavierCONN: U7.2 Xavier.3 | length 129.3
  Bottom Layer w80: Xavier.3@3386.06,882.68 3386.06,892.99 3415,921.93 3415,1000
pads on no net: BATTCONN. BP1.7 BP1.14 BP1.15 BP1.16 BP1.17 BP1.20 BP1.21 BP1.22 BP1.23 BP1.24 BP1.25 BP1.26 BP1.27 BP1.28 BP1.33 BP1.34 BP1.35 BP1.36 BP1.39 BP1.40 BP1.41 BP1.42 BP1.50 ESCCONN.M1 ESCCONN.M2 J3. J?. POT1.2 POT2.2 U1.4 U2.4 U50.11 U50.13 Xavier.

## Polygon pours and split planes (outlines as drawn)
GND on Bottom Layer "GND_L02_P046" (solid, remove dead copper, pour order 46): -730,4245 -730,-220 -585,-365 -545,-325 5140,-325 5140,4075 4835,4380
3V3 on Bottom Layer "3V3_L02_P000" (solid, pour order 0): 1480,675 1480,485 1810,485 1864.32,539.32 1916.35,539.32 1916.35,608.65 1900,625 1685,625 1635,675
+5 on Bottom Layer "+5_L02_P003" (solid, pour order 3): 2069.87,500.13 1823.65,500.13 1823.65,498.65 1615,290 1970,290 2125,445
3V3 on Bottom Layer "PolygonDirect" (solid, pour order 4): 625,75 625,300 675,350 825,350 875,300 875,75
+5 on Bottom Layer "PolygonDirect" (solid, pour order 35): 1615,75 1615,290 1675,350 1835,350 1885,300 1885,75
GND on Bottom Layer "PolygonDirect" (solid, pour order 22): 1315,75 1315,290 1375,350 1525,350 1585,290 1585,75
GND on Bottom Layer "PolygonDirect" (solid, pour order 6): 920,75 920,295 975,350 1125,350 1185,290 1185,75
GND on Top Layer "GND_L01_P045" (solid, remove dead copper, pour order 45): -685,4170 -560,4045 -560,-410 3660,-410 4880,810 4880,4310
GND on Top Layer "GND_L01_P043" (solid, pour order 43): 2835,620 2770,555 2770,535 2800,505 2840,505 2895,560 2920,560 2925,565 2925,610 2915,620
V+ on Top Layer "V+_L01_P042" (solid, pour order 42): 2395,3195 2395,3430 2315,3510 1225,3510 1225,3350 1245,3330 1345,3330 1345,3145.59
V+ on Top Layer "V+_L01_P040" (solid, pour order 40): 1220,3195 1220,3030 1350,3030 1350,2780 2370,2780 2395,2805 2395,3195
NetQ?_1 on Top Layer "NETQ?_1_L01_P032" (solid, pour order 32): 3065,1020 3065,1015 3065,695.27 3390.79,363.21 3465,430 3205,710 3205,1015 3200,1020
3V3 on Top Layer "PolygonDirect" (solid, pour order 1): 625,75 625,300 675,350 825,350 875,300 875,75
+5 on Top Layer "PolygonDirect" (solid, pour order 7): 1615,75 1615,285 1680,350 1830,350 1880,300 1880,75
GND on Top Layer "PolygonDirect" (solid, pour order 5): 1325,75 1325,300 1375,350 1525,350 1575,300 1575,75
GND on Top Layer "PolygonDirect" (solid, pour order 2): 925,75 925,300 975,350 1125,350 1175,300 1175,75

## Keep-outs
Keep-Out Layer:
  lines w6: 4000,2425 4000,310 3443,310 3443,0 557,0 557,310 0,310 0,4000 4000,4000 4000,3465

## Other copper
Top Layer:
  rectangle net V+: 1225,785 2360,2845
  rectangle net V+: 1130,2045 1505,2255
  rectangle net +12: 3380,2510 3770,3005
  rectangle net +5: 3340,1135 3735,1500
  rectangle net Motor_Power: 580,2435 1195,3580
  rectangle net STBD_BATT: 555,950 870,1595
  rectangle net STBD_BATT: 585,1425 1115,1595
  rectangle net V+: 2185,2545 2725,2845
  rectangle net V+: 2060,2400 2365,2845
  rectangle net V+: 2250,1150 2715,1460
  rectangle net V+: 1130,1370 1505,1580
  rectangle net PORT_BATT: 560,1615 870,2265
  rectangle net PORT_BATT: 735,2100 1110,2265